# Altium PCB TYPEC_4KRECEIVER-v1.0.PcbDoc (part 8 of 12)
Units mil, origin at the board's own origin, x right, y up, seen from the top; angles counter-clockwise.
Board outline 2834.7 x 1259.84 mil, 10 copper layers (Top Layer, GND-1, Signal L1, GND-2, PWR-1, PWR-2, GND-3, Signal L2, GND-4, Bottom Layer), stack 61.686 mil thick; 492 components, 339 nets, 2214 pads, 1169 vias.
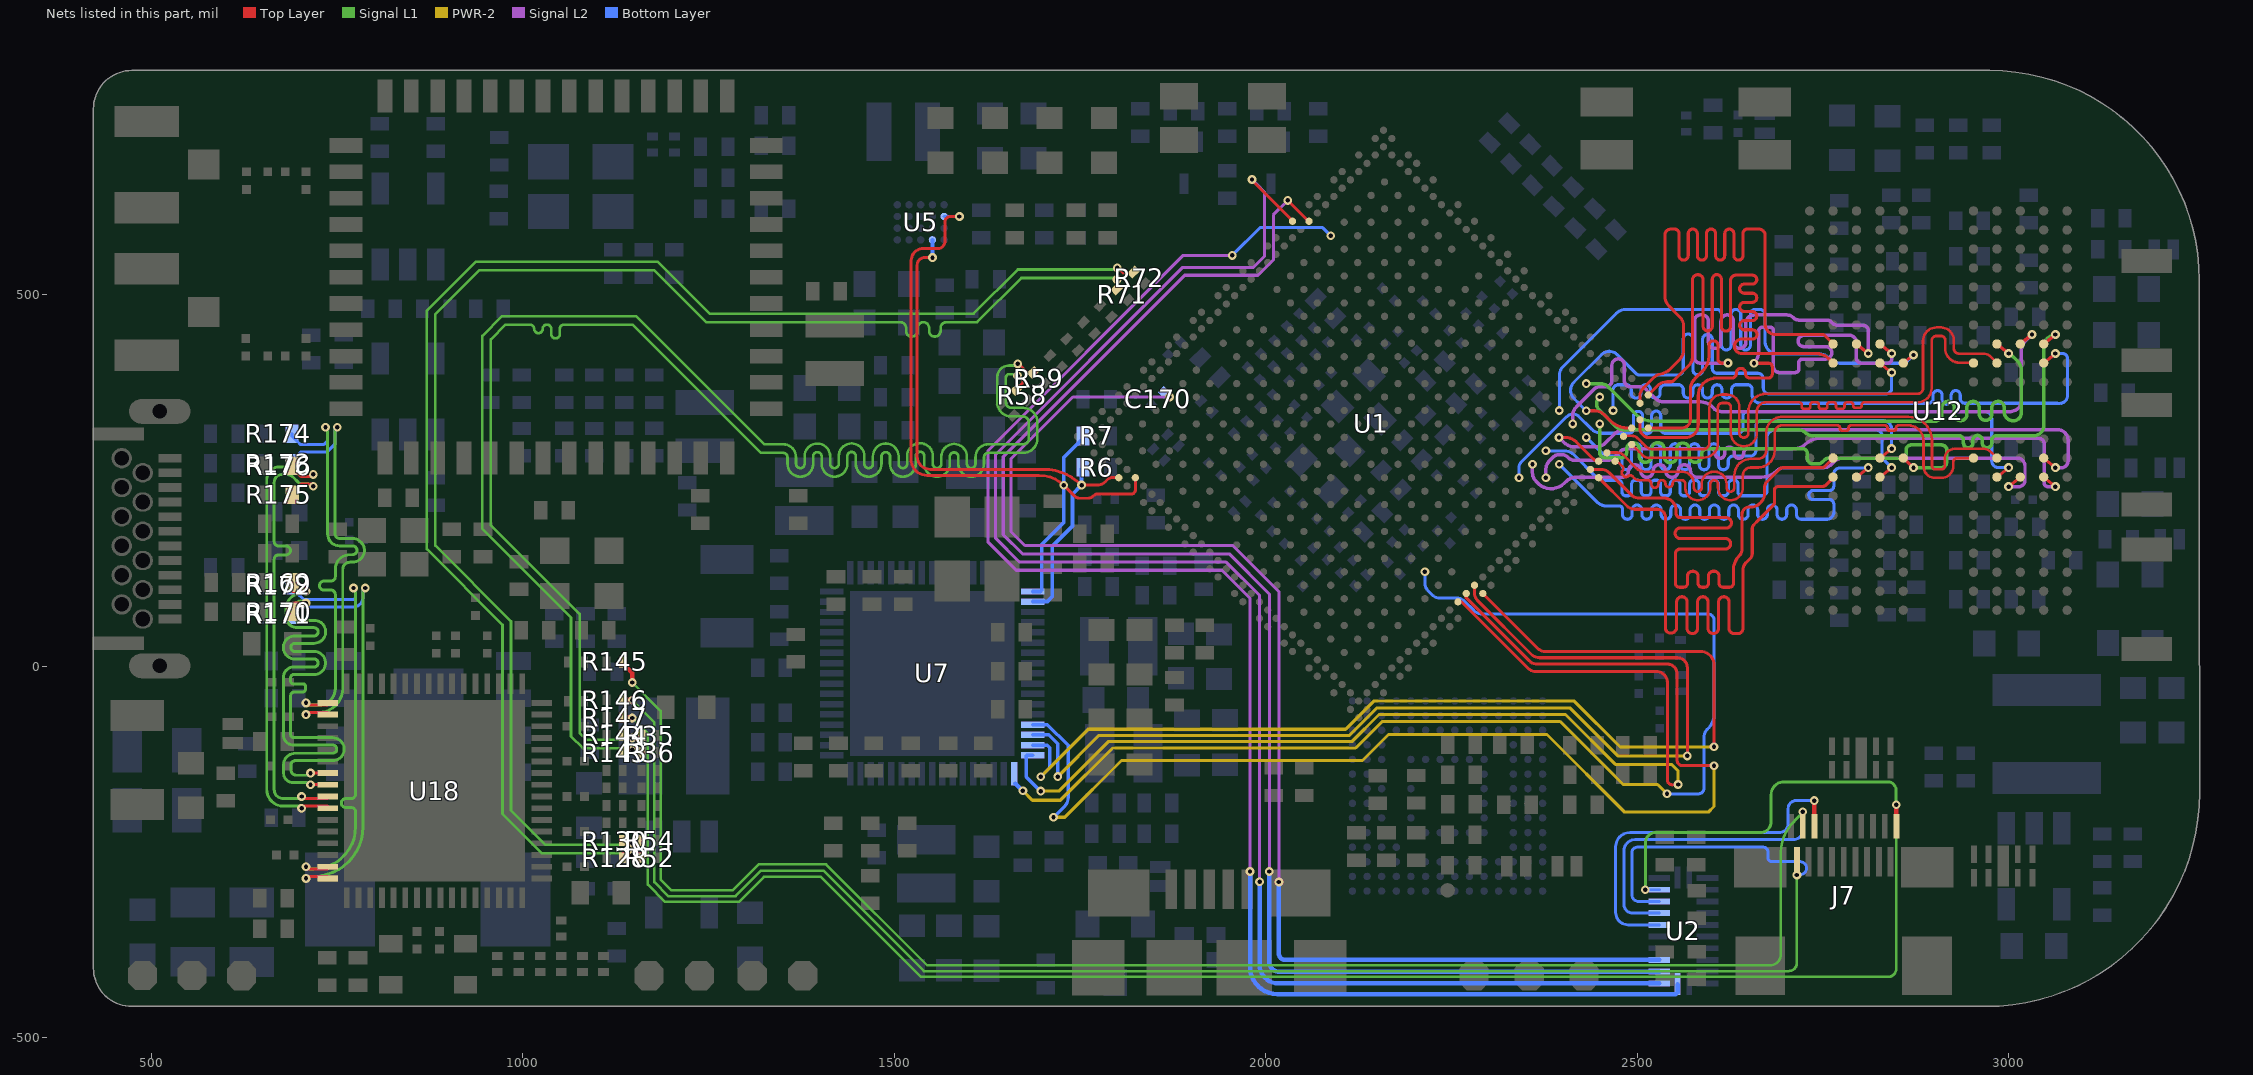
[diagram p13: the nets of this part, all layers, seen from the top]

## Via types
v1: diameter 11.81, hole 5.91, Top Layer to Bottom Layer, tented both sides, 698 vias
v2: diameter 15.75, hole 7.87, Top Layer to Bottom Layer, tented both sides, 248 vias
v3: diameter 11.81, hole 5.91, Top Layer to Signal L1, tented both sides, 121 vias
v4: diameter 11.81, hole 5.91, Top Layer to Bottom Layer, 44 vias
v5: diameter 11.81, hole 5.91, Signal L2 to Bottom Layer, 41 vias
v6: diameter 11.81, hole 5.91, Top Layer to Signal L1, 17 vias

## Nets (pads, with @x,y where several pads share a name; then routed paths per layer and width w, separated by ;. In a path a pad name is that pad's centre, name@x,y a point inside that pad or via, vN(x,y) a via of type N, cw(c..) or ccw(c..) an arc to the next point about the centre after c; other vN are vias at no path point) (continued)
HDMI_TX2_N: R36.1 R59.2 R143.1 | length 1998.7
  Top Layer w3.5: R143.1@1134.71,-116.59 1134.71,-110.73 1147.54,-110.65 v3(1147.55,-112.8) ; v3@1147.57,-110.65 1160.21,-110.73 R36.1@1160.25,-116.59 ; v6(1666.48,406.58) 1668.2,406.58 1680.88,393.91 1685.92,393.91 R59.2@1687.2,395.18
  Signal L1 w3.5: v3(1147.55,-112.8) ccw(c1145.4,-112.8) 1146.85,-111.21 ccw(c1145.4,-112.8) 1145.4,-110.65 1080.99,-110.65 1065.17,-94.83 1065.17,65.25 945.75,184.67 945.75,444.49 972.25,470.99 1152.78,470.99 1250.78,373 1325.38,298.4 1350.76,298.4 cw(c1350.76,281.15) 1368.01,281.15 1368.01,272.09 ccw(c1373.76,272.09) 1373.76,266.35 ccw(c1373.76,272.09) 1379.51,272.09 ; v3@1147.55,-111.21 1148.96,-111.21 v3@1150.55,-112.8 ; 1379.51,272.14 1379.51,282.15 cw(c1396.76,282.04) 1414.01,282.08 1414.01,272.1 ccw(c1419.76,272.09) 1419.76,266.35 ccw(c1419.76,272.09) 1425.51,272.09 1425.51,282.33 cw(c1442.76,282.31) 1460.01,282.37 1460.01,272.1 ; 1460.01,272.09 ccw(c1465.76,272.09) 1465.76,266.35 ccw(c1465.76,272.09) 1471.51,272.09 1471.51,282.21 cw(c1488.76,282.2) 1506.01,282.26 1506.01,272.1 ccw(c1511.76,272.09) 1511.76,266.35 ccw(c1511.76,272.09) 1517.51,272.09 1517.51,282.41 cw(c1535.01,282.41) 1535,299.9 ; 1535.03,299.9 cw(c1535.01,282.9) 1552.01,282.9 1552.01,272.09 ccw(c1557.76,272.09) 1557.76,266.35 ccw(c1557.76,272.09) 1563.51,272.09 1563.51,281.67 cw(c1580.76,281.66) 1598.01,281.72 1598.01,272.1 ccw(c1603.76,272.09) 1603.76,266.35 ccw(c1603.76,272.09) 1609.51,272.09 1609.51,281.15 cw(c1626.76,281.15) 1626.76,298.4 1673.52,298.4 ccw(c1673.52,306.3) 1681.42,306.3 1681.42,327.54 ccw(c1672.93,327.54) 1673.18,336.03 1657.39,336.04 cw(c1657.39,354.45) 1651.74,336.93 cw(c1657.39,354.45) 1639.87,348.79 cw(c1657.39,354.45) 1638.98,354.45 1638.98,388.8 cw(c1654.62,388.8) 1654.62,404.43 1664.33,404.43 ccw(c1664.33,406.58) v6(1666.48,406.58)
HDMI_TX2_P: R35.1 R58.2 R144.1 | length 1998.7
  Top Layer w3.5: R144.1@1134.71,-93.37 1134.71,-99.23 1147.52,-99.15 v3(1147.55,-96.99) ; v3@1147.59,-99.15 1160.21,-99.23 R35.1@1160.25,-93.37 ; R58.2@1664.7,372.41 1672.9,380.61 1672.9,384.06 v6(1666.18,390.78)
  Signal L1 w3.5: v3@1147.55,-98.58 1148.96,-98.58 v3@1150.55,-96.99 ; v3(1147.55,-96.99) cw(c1145.4,-96.99) 1146.85,-98.58 cw(c1145.4,-96.99) 1145.4,-99.15 1085.76,-99.15 1076.67,-90.06 1076.67,70.01 957.25,189.43 957.25,439.73 977.01,459.49 1009.78,459.49 cw(c1009.78,453.74) 1015.53,453.74 ccw(c1021.28,453.74) 1027.03,453.74 cw(c1032.78,453.74) 1038.53,453.74 1038.53,446.71 ccw(c1044.28,446.71) 1050.03,446.71 1050.03,453.74 cw(c1055.78,453.74) 1055.78,459.49 1148.02,459.49 1320.62,286.9 1350.76,286.9 cw(c1350.76,281.15) 1356.51,281.15 1356.51,272.09 ccw(c1373.76,272.09) 1373.76,254.85 ccw(c1373.76,272.09) 1391.01,272.09 ; 1391.01,272.13 1391.01,282.09 cw(c1396.76,282.04) 1402.51,282.08 1402.51,272.09 ccw(c1419.76,272.09) 1419.76,254.85 ccw(c1419.76,272.09) 1437.01,272.09 1437.01,282.32 cw(c1442.76,282.31) 1448.51,282.34 1448.51,272.09 ccw(c1465.76,272.09) 1465.76,254.85 ccw(c1465.76,272.09) 1483.01,272.09 1483.01,282.21 cw(c1488.76,282.2) 1494.51,282.22 1494.51,272.09 ccw(c1511.76,272.09) 1511.76,254.85 ccw(c1511.76,272.09) 1529.01,272.09 1529.01,282.41 cw(c1535.01,282.41) 1534.97,288.4 cw(c1535.01,282.9) 1540.51,282.9 1540.51,272.09 ccw(c1557.76,272.09) 1557.76,254.85 ccw(c1557.76,272.09) 1575.01,272.09 1575.01,281.67 cw(c1580.76,281.66) 1586.51,281.68 1586.51,272.09 ccw(c1603.76,272.09) 1603.76,254.85 ccw(c1603.76,272.09) 1621.01,272.09 1621.01,281.15 cw(c1626.76,281.15) 1626.76,286.9 1673.59,286.9 ccw(c1673.66,306.16) 1692.92,306.16 1692.92,327.85 ccw(c1673.24,327.85) 1673.53,347.53 1657.39,347.54 cw(c1657.39,354.45) 1650.48,354.45 1650.48,388.39 cw(c1655.03,388.39) 1655.03,392.93 1664.03,392.93 cw(c1664.03,390.78) v6(1666.18,390.78)
HDMI_TX_CEC: J7.15 U2.6 | length 503.6
  Top Layer w6: J7.15@2738.58,-215.28 v1(2738.58,-181.19) v1@2738.58,-179.97
  Bottom Layer w4: U2.6@2529.88,-348.4 2487.87,-348.4 cw(c2487.87,-331.76) 2471.23,-331.76 2471.23,-243.21 cw(c2490.25,-243.21) 2490.25,-224.19 2691.44,-224.19 ccw(c2691.44,-212.28) 2703.35,-212.28 2703.35,-191.7 cw(c2713.86,-191.7) 2713.86,-181.19 v1(2738.58,-181.19)
HDMI_TX_HPD: J7.1 R147.1 U2.9 | length 2767.7
  Top Layer w4: v1(2848.79,-186.84) v1@2848.9,-186.95 ; J7.1@2848.9,-215.37 J7.1@2849.02,-215.48
  Top Layer w6: J7.1@2848.9,-215.37 v1@2848.9,-186.95
  Top Layer w8: R147.1@1136.21,-69.96 v3(1147.55,-69.96)
  Signal L1 w3.5: v3(1147.55,-69.96) 1168.49,-90.9 1168.49,-294.36 1191.48,-317.36 1291.15,-317.36 1324.82,-283.69 1401.39,-283.69 1536.13,-418.43 2838.01,-418.43 ccw(c2838.01,-407.65) 2848.79,-407.65 v1(2848.79,-186.84)
  Signal L1 w4: v1(2511.11,-301.15) 2511.11,-238.17 cw(c2525.1,-238.17) 2525.1,-224.19 2666.01,-224.19 ccw(c2666.01,-209.83) 2680.38,-209.83 2680.38,-173.49 cw(c2698.05,-173.49) 2698.05,-155.81 2837.04,-155.81 cw(c2837.04,-167.56) 2848.79,-167.56 v1(2848.79,-186.84)
  Bottom Layer w4: v1(2511.11,-301.15) U2.9@2529.88,-301.15
HDMI_TX_SCL: J7.17 R145.1 U2.7 | length 2529.9
  Top Layer w4: J7.17@2723.04,-215.48 v1@2723.04,-198.95
  Top Layer w5.6: R145.1@1134.71,5.47 1134.71,3.5 1147.55,-9.34 v3(1147.55,-22.15)
  Signal L1 w3.5: v3(1147.55,-22.15) 1185.77,-60.36 1185.77,-287.08 1200.68,-302 1282.64,-302 1317.66,-266.98 1408.57,-266.98 1544.61,-403.02 2678.64,-403.02 ccw(c2678.64,-388.01) 2693.65,-388.01 2693.65,-250.65 cw(c2750.22,-250.62) 2708.18,-212.77 v1(2723.04,-196.27)
  Bottom Layer w4: U2.7@2529.88,-332.65 2494.06,-332.65 cw(c2494.06,-321.02) 2482.42,-321.02 2482.42,-249.37 2482.41,-249.02 cw(c2497.35,-248.62) 2497.35,-233.68 2710.69,-233.68 ccw(c2710.69,-221.33) 2723.04,-221.33 v1@2723.04,-198.95
HDMI_TX_SDA: J7.18 R146.1 U2.8 | length 2402.2
  Top Layer w4: v1(2715.08,-281.28) 2715.16,-281.2 J7.18@2715.16,-263.51
  Top Layer w8: R146.1@1136.21,-46.06 v3(1147.55,-46.06)
  Signal L1 w3.5: v3(1147.55,-46.06) 1177.23,-75.73 1177.23,-290.92 1195.95,-309.64 1286.63,-309.64 1320.9,-275.36 1404.87,-275.36 1540.09,-410.58 2704.02,-410.58 ccw(c2704.02,-399.52) 2715.08,-399.52 v1(2715.08,-281.28)
  Bottom Layer w4: U2.8@2529.88,-316.9 2502.03,-316.9 cw(c2502.03,-307.93) 2493.06,-307.93 2493.06,-250.93 cw(c2500.12,-250.93) 2500.12,-243.87 2670.09,-243.87 cw(c2670.09,-249.78) 2676,-249.78 2676,-257.6 ccw(c2681.79,-257.6) 2681.79,-263.39 2719.91,-263.39 cw(c2719.91,-267.39) 2720.25,-263.4 cw(c2719.4,-272.08) 2721.35,-280.57 v1(2715.08,-281.28)
HDMI_TXCLK_N: R52.1 R72.2 R128.1 | length 1998.7
  Top Layer w3.5: R128.1@1134.71,-258.2 1134.71,-252.34 1147.54,-252.25 v3(1147.55,-254.41) ; v3@1147.57,-252.25 1160.21,-252.34 R52.1@1160.25,-258.2 ; v6@1800.8,536.17 1808.18,528.8 R72.2@1815.76,528.8 ; R72.2@1815.76,528.79 1820.81,528.79 R72.2@1822.2,530.18
  Signal L1 w3.5: v3(1147.55,-254.41) ccw(c1145.4,-254.41) 1145.4,-252.25 1025.98,-252.25 972.87,-199.14 972.87,55.43 871.11,157.19 871.11,478.41 936.92,544.22 1181.76,544.22 1251.72,474.27 1607.09,474.27 1666.53,533.71 1798.33,533.71 ccw(c1798.33,535.86) v6(1800.48,535.86) ; v3@1147.55,-252.25 1150.55,-252.25 v3@1150.55,-254.41
HDMI_TXCLK_P: R54.1 R71.2 R130.1 | length 1998.7
  Top Layer w3.5: R130.1@1134.71,-234.98 1134.71,-240.84 1147.52,-240.75 v3(1147.55,-238.6) ; v3@1147.59,-240.75 1160.21,-240.84 R54.1@1160.25,-234.98 ; R71.2@1799.7,507.68 1801.09,509.07 1801.09,514.12 1800.96,514.24 v6@1800.96,519.75
  Signal L1 w3.5: v3@1147.55,-240.75 1150.55,-240.75 v3@1150.55,-238.6 ; v3(1147.55,-238.6) cw(c1145.4,-238.6) 1145.4,-240.75 1030.75,-240.75 984.37,-194.37 984.37,60.2 882.61,161.95 882.61,473.65 941.69,532.72 1177,532.72 1246.96,462.77 1491.09,462.77 1508.34,462.77 cw(c1508.34,455.02) 1516.09,455.02 1516.09,451.16 ccw(c1523.84,451.16) 1531.59,451.16 1531.59,455.02 cw(c1539.34,455.02) 1547.09,455.02 1547.09,451.19 ccw(c1554.84,451.19) 1562.59,451.19 1562.59,455.02 cw(c1570.34,455.02) 1570.34,462.77 1599.18,462.77 1611.85,462.77 1671.29,522.21 1798.03,522.21 cw(c1798.03,520.05) v6(1800.18,520.05)
HDMITX_CEC: U1.1V5 U2.24 | length 2201.8
  Signal L2 w4.1: v5(1955.2,552.67) 1889.01,552.67 1626.52,290.18 1626.52,166.58 1664.22,128.88 1941.45,128.88 1979.08,91.25 v5(1979.08,-276.57)
  Bottom Layer w4.1: v5(1955.2,552.67) 1992.55,590.03 2076.89,590.03 v1(2087.75,579.16)
  Bottom Layer w6: v5(1979.08,-276.57) 1979.08,-405.02 ccw(c2015.68,-405.02) 2015.68,-441.62 2551.81,-441.62 2554.48,-438.95 U2.24@2554.48,-428.12
HDMITX_HPD: C170.2 U1.1V17 U2.3 | length 1743.9
  Signal L2 w4.1: v1(1870.52,362.02) 1740.49,362.02 1657.2,278.73 1657.2,181.01 1675.91,162.29 1955.82,162.29 2017.92,100.19 v5(2017.92,-290.66)
  Bottom Layer w6: v5(2017.92,-290.66) 2017.92,-387.07 ccw(c2026.5,-387.07) 2026.5,-395.66 U2.3@2529.88,-395.64
HDMITX_SCL: U1.AR12 U2.1 | length 2210.9
  Top Layer w4.1: v1(1981.78,654.81) 1981.78,653.96 2036.26,599.49 U1.AR12@2036.26,598.64
  Signal L2 w4.1: v1(1981.78,654.81) 1989.33,647.27 1998.61,637.98 1998.61,551.43 1983.71,536.53 1888.39,536.53 1636.65,284.78 1636.65,171.89 1668.73,139.81 1947.02,139.81 1991.99,94.84 v5(1991.99,-290.44)
  Bottom Layer w6: v5(1991.99,-290.44) 1991.99,-402.12 ccw(c2017.1,-402.12) 2017.1,-427.23 2529.78,-427.23 U2.1@2529.88,-427.14
HDMITX_SDA: U1.AP11 U2.2 | length 2123.3
  Top Layer w4.1: v1(2029.81,626.65) 2057.81,598.64 U1.AP11@2058.53,598.64
  Signal L2 w4.1: v5@2005.01,-274.32 2005.01,97.02 1951.08,150.95 1672.78,150.95 1646.88,176.86 1646.88,281.75 1891.04,525.91 1989.92,525.91 2010.5,546.48 2010.5,607.33 v1(2029.81,626.65)
  Bottom Layer w6: v5(2005.01,-276.57) 2005.01,-398.33 ccw(c2018.13,-398.33) 2018.13,-411.45 2529.81,-411.45 U2.2@2529.88,-411.39
I2C0_SCL_PMIC: R7.2 U1.AJ37 U5.A3 U7.1 | length 985.4
  Top Layer w4: 1523.05,275.03 ccw(c1527.05,275.08) 1523.09,274.48 ccw(c1544.08,277.95) 1544.08,256.68 ; 1523.05,275.08 1523.05,545.73 cw(c1539.23,545.73) 1539.23,561.91 1559.4,561.91 ; 1544.12,256.68 1628.56,256.68 1682.49,256.68 1695.2,256.68 cw(c1695.2,208.78) 1729.08,242.65 1743.19,228.53 ccw(c1749.73,235.01) 1749.73,225.8 ; 1559.42,561.91 ccw(c1559.4,565.91) 1559.86,561.93 ccw(c1558.7,571.52) 1568.35,571.86 1568.33,572.27 1568.33,597.56 cw(c1575.84,597.56) 1575.84,605.06 v1(1587.86,605.06) ; 1749.76,225.8 1760.51,225.8 ccw(c1760.51,237.11) 1765.25,226.85 ccw(c1760.51,237.11) 1768.5,229.12 cw(c1774.64,222.98) 1774.64,231.66 1785.38,231.66 1799.42,231.66 1819.75,231.66 ccw(c1819.74,236.6) 1824.68,236.6 U1.AJ37@1824.68,253.44
  Bottom Layer w4.1: U5.A3@1567.36,605.06 v1(1587.86,605.06)
  Bottom Layer w5: U7.1@1686.51,100.27 1696.86,100.27 1698.69,102.1 1698.69,163.45 1728.24,193 1728.24,280.52 1736.85,289.13 1747.3,299.58 1747.68,299.58 1754.18,306.08 R7.2@1754.18,307.58
  other v1: 1728.41,243.4
I2C0_SDA_PMIC: R6.2 U1.AK38 U5.B1 U7.2 | length 818.2
  Top Layer w4: v1(1551.61,549.73) 1540.93,549.73 ccw(c1540.93,539.85) 1531.05,539.85 1531.05,281.91 ccw(c1548.2,281.91) 1548.2,264.76 1701,264.76 1701.05,264.76 cw(c1701.03,192.23) v1(1752.31,243.49)
  Top Layer w4.1: v1(1752.31,243.49) 1773,243.49 ccw(c1773,259.69) 1784.46,248.23 1787.96,251.73 cw(c1792.1,247.59) 1792.1,253.44 U1.AK38@1802.41,253.44
  Bottom Layer w4: R6.2@1752.54,265.61 R6.2@1754.18,267.26
  Bottom Layer w5: v1(1551.61,549.73) U5.B1@1551.61,573.56 ; U7.2@1686.51,86.49 1686.97,86.95 1706.54,86.95 1712.7,93.1 1712.7,160.99 1740.09,188.38 1740.09,231.26 v1(1752.31,243.49) 1752.36,265.43 R6.2@1752.54,265.61
I2S1_LRCK_TX_M0: U1.B24 U7.14 | length 1703.5
  Top Layer w4.1: U1.B24@2270.1,97.55 2270.1,91.75 2354.94,6.91 ccw(c2365.54,17.53) 2365.54,2.53 2540.77,2.53 cw(c2540.77,-10.5) 2553.8,-10.5 2553.8,-126.55 ccw(c2561.41,-126.55) 2561.41,-134.17 v1(2603.61,-134.17)
  PWR-2 w4.1: v1(1714.56,-203.54) 1729.68,-203.54 1806,-127.22 2130.49,-127.22 2165.51,-92.21 2378.72,-92.21 2483.28,-196.77 2595.9,-196.77 2603.61,-189.05 v1(2603.61,-134.17)
  Bottom Layer w4.5: U7.14@1686.51,-78.87 1686.62,-78.98 1706.37,-78.98 1734.26,-106.88 1734.26,-177.12 cw(c1718.02,-177.12) 1729.48,-188.63 v1(1714.56,-203.54)
I2S1_MCLK_M0: U1.A23 U7.16 | length 1505.6
  Top Layer w4.1: U1.A23@2292.37,97.55 2365.77,24.12 ccw(c2376.88,35.15) 2376.84,19.49 2585.41,19.49 cw(c2585.41,1.29) 2603.61,1.29 v1(2603.61,-108.75)
  PWR-2 w4.1: v1(1697.36,-148.97) 1761.22,-85.11 2107.82,-85.11 2145.54,-47.38 2415.54,-47.38 2476.91,-108.75 v1(2603.61,-108.75)
  Bottom Layer w4.5: U7.16@1686.67,-106.59 1706.41,-106.59 1709.56,-109.74 1709.56,-136.77 v1(1697.36,-148.97)
I2S1_SCLK_TX_M0: U1.B23 U7.15 | length 1456.9
  Top Layer w4.1: U1.B23@2281.24,108.68 2281.24,98.44 ccw(c2296.24,98.44) 2285.63,87.84 2357.93,15.53 ccw(c2368.54,26.14) 2368.54,11.14 2554.36,11.14 cw(c2554.36,-2.11) 2567.61,-2.11 v1(2567.61,-120.97)
  PWR-2 w4.1: v1(1720.15,-148.87) 1775.36,-93.67 2112.78,-93.67 2150.09,-56.36 2409.49,-56.36 2474.11,-120.97 v1(2567.61,-120.97)
  Bottom Layer w4.5: U7.15@1686.51,-92.65 1708.01,-92.65 1720.15,-104.79 v1(1720.15,-148.87)
I2S1_SDI0_M0: U1.1B14 U7.18 | length 1680.8
  PWR-2 w4.1: v1(1673.36,-167.97) 1686.06,-180.68 1723.65,-180.68 1794.09,-110.23 2121.19,-110.23 2156.84,-74.58 2396.43,-74.58 2481.24,-159.39 2527.67,-159.39 v1(2540.26,-171.97)
  Bottom Layer w4.1: v1@2214.42,126.78 2214.42,111.67 ccw(c2229.42,111.67) 2218.81,101.07 2223.96,95.92 ccw(c2234.57,106.53) 2234.57,91.53 2257.14,91.53 cw(c2257.14,76.53) 2267.74,87.14 2279.98,74.9 ccw(c2291.88,86.79) 2291.88,69.97 2595.55,69.97 cw(c2595.55,61.9) 2603.61,61.9 2603.61,-65.65 cw(c2578.43,-65.65) 2596.22,-83.47 2594.7,-84.99 ; v1(2540.26,-171.97) 2583.06,-171.97 ccw(c2583.06,-165.16) 2589.87,-165.16 2589.87,-96.67 cw(c2606.38,-96.67) 2594.69,-85.01
  Bottom Layer w6: U7.18@1663.34,-158.61 v1@1672.36,-167.62
  other v1: 2214.42,126.78
I2S1_SDO0_M0: U1.B25 U7.17 | length 1492.8
  Top Layer w4.1: U1.B25@2258.97,86.41 2263.8,86.41 2353.29,-3.09 ccw(c2363.89,7.53) 2363.89,-7.47 2525.98,-7.47 cw(c2525.98,-22.29) 2540.8,-22.29 2540.8,-153.28 ccw(c2547.39,-153.32) 2547.25,-159.91 ccw(c2547.3,-155.81) 2547.31,-159.91 2547.42,-159.91 2547.53,-159.91 v1(2555.26,-159.47)
  PWR-2 w4.1: v1(1697.36,-168.42) 1721.66,-168.42 1788.18,-101.9 2116,-101.9 2152.55,-65.35 2403.76,-65.35 2470.68,-132.27 2546.24,-132.27 2555.26,-141.29 v1(2555.26,-159.47)
  Bottom Layer w5: U7.17@1686.51,-120.21 1678.63,-120.21 1677.8,-121.04 1677.8,-149.24 1696.98,-168.42 v1(1697.36,-168.42)
LANE0_RX2_N: R175.1 U18.41 | length 636.8
  Top Layer w4.1: R175.1@690.09,230.3 690.09,233.8 697.04,240.75 697.42,240.75 701.57,244.9 718.1,244.9 v3(718.1,242.04) ; v3(702.46,-175.61) 702.46,-178.46 737.43,-178.47 U18.41@737.43,-175.65
  Signal L1 w4: 677.95,-178.52 cw(c677.93,-166.19) 665.61,-166.19 665.61,-164.61 665.61,124.45 665.61,143.55 cw(c671.61,143.55) 670.39,149.42 671.61,149.55 681.44,149.55 ccw(c681.44,155.55) 681.44,161.55 671.61,161.55 cw(c671.61,167.55) 670.39,161.68 cw(c671.61,167.55) 665.61,167.55 665.61,247.3 cw(c676.06,247.3) 667.38,253.11 cw(c676.06,247.3) 670.25,255.98 cw(c676.06,247.3) 676.06,257.74 681.77,257.74 cw(c681.77,243.96) 691.51,253.71 697.36,247.86 ccw(c704.39,254.89) 697.4,247.82 ccw(c704.39,254.89) 704.35,244.95 ; 677.96,-178.52 679.51,-178.51 702.46,-178.51 v3(702.46,-175.61) ; 704.39,244.95 711.08,244.95 cw(c711.08,235.03) v3(718.1,242.04)
LANE0_RX2_P: R176.1 U18.42 | length 636.7
  Top Layer w4.1: R176.1@690.09,269.6 690.09,266.1 697.04,259.15 697.28,259.15 701.43,255 718.1,255 v3(718.1,257.85) ; v3(702.46,-191.42) 702.46,-188.56 737.43,-188.57 U18.42@737.43,-191.39
  Signal L1 w4: 701.35,258.01 694.53,264.83 ccw(c687.5,257.8) 687.5,267.74 672.01,267.74 ccw(c672.01,251.34) 667.13,267 ccw(c672.01,251.34) 656.36,256.23 ccw(c672.01,251.34) 655.61,251.34 655.61,124.45 655.61,-164.61 655.61,-166.19 ccw(c677.93,-166.19) 677.96,-188.52 679.52,-188.51 702.46,-188.51 v3(702.46,-191.42) ; 701.36,258 ccw(c708.75,265.4) 708.75,254.95 711.02,254.95 ccw(c711.02,259.91) 714.53,256.4 cw(c718.04,252.89) 718.04,257.85 v3(718.1,257.85)
LANE1_TX2_N: R173.1 U18.34 | length 600.2
  Top Layer w4.1: v3(708.46,-65.44) 708.46,-62.59 737.43,-62.59 U18.34@737.43,-65.42
  Signal L1 w4: v3(708.46,-65.44) cw(c711.37,-65.44) 711.37,-62.53 725.53,-62.53 ccw(c725.53,-30.17) 757.9,-30.17 757.9,130.11 cw(c767.51,130.11) 767.51,139.73 771.01,139.73 ccw(c771.01,155.73) 771.01,171.73 753.65,171.73 cw(c753.65,177.73) 747.65,177.73 747.65,318.47 cw(c750.55,318.47) v4(750.55,321.38)
  Bottom Layer w4.1: R173.1@689.68,273.06 689.68,276.56 696.63,283.51 696.89,283.51 701.16,287.78 736.36,287.78 747.7,299.12 747.7,318.52 cw(c750.55,318.52) v4(750.55,321.38)
LANE1_TX2_P: R174.1 U18.33 | length 600.3
  Top Layer w4.1: v3(708.46,-49.63) 708.46,-52.49 737.43,-52.49 U18.33@737.43,-49.67
  Signal L1 w4: v3(708.46,-49.63) ccw(c711.37,-49.63) 711.37,-52.54 725.53,-52.53 ccw(c725.53,-30.17) 747.9,-30.17 747.9,94.28 747.9,96.28 ccw(c741.9,96.28) 743.32,102.11 ccw(c741.9,96.28) 743.27,102.13 ccw(c741.9,96.28) 741.9,102.28 732.54,102.28 cw(c732.54,108.28) 732.54,114.28 741.9,114.28 ccw(c741.9,120.28) 743.27,114.44 ccw(c741.9,120.28) 743.32,114.45 ccw(c741.9,120.28) 747.9,120.28 747.9,130.45 cw(c767.18,130.45) 767.18,149.73 771.01,149.73 ccw(c771.01,155.73) 771.01,161.73 753.65,161.73 cw(c753.65,177.73) 737.65,177.73 737.65,318.47 ccw(c734.74,318.47) v4(734.74,321.38)
  Bottom Layer w4.1: R174.1@689.68,312.6 689.68,309.1 696.63,302.15 696.99,302.15 701.26,297.88 732.18,297.88 737.6,303.3 737.6,318.52 ccw(c734.74,318.52) v4(734.74,321.38)
LANE2_TX1_N: R169.1 U18.40 | length 637
  Top Layer w4.1: R169.1@690.36,112.39 690.36,100.64 v3(708.36,100.64) ; v3(714.46,-159.93) 714.72,-159.67 737.2,-159.67 U18.40@737.43,-159.91
  Signal L1 w4: v3(708.36,100.64) 708.36,97.73 702.73,97.73 ccw(c702.73,76.35) 681.34,76.35 681.34,67.03 ccw(c696.84,67.03) 696.84,51.53 719.43,51.53 cw(c719.43,46.03) 719.43,40.53 693.47,40.53 ccw(c693.47,25.03) 693.47,9.53 719.26,9.53 cw(c719.26,4.03) 719.26,-1.47 691.84,-1.47 ccw(c691.84,-15.47) 677.84,-15.47 677.84,-92.43 ccw(c691.84,-92.43) 691.84,-106.43 744.33,-106.43 cw(c744.33,-111.93) 744.33,-117.43 693.78,-117.43 ccw(c693.78,-132.93) 678.28,-132.93 678.28,-144.28 ccw(c691.03,-144.28) 691.03,-157.02 714.46,-157.03 v3(714.46,-159.93)
LANE2_TX1_P: R170.1 U18.39 | length 636.8
  Top Layer w4.1: R170.1@690.35,73.08 690.35,84.83 v3(708.36,84.83) ; v3@714.48,-144.14 U18.39@737.43,-144.16
  Signal L1 w4: v3(708.36,84.83) 708.36,87.73 702.73,87.73 ccw(c702.73,76.35) 691.34,76.35 691.34,67.03 ccw(c696.84,67.03) 696.84,61.53 719.43,61.53 cw(c719.43,46.03) 719.43,30.53 693.47,30.53 ccw(c693.47,25.03) 693.47,19.53 719.26,19.53 cw(c719.26,4.03) 719.26,-11.47 691.84,-11.47 ccw(c691.84,-15.47) 689,-12.67 ccw(c691.84,-15.47) 687.84,-15.47 687.84,-20.55 ccw(c691.29,-20.55) 691.29,-23.99 704.13,-23.99 cw(c704.13,-27.67) 707.81,-27.67 707.81,-31.16 cw(c704.13,-31.16) 704.13,-34.84 692.81,-34.84 ccw(c692.81,-39.8) 687.84,-39.79 687.84,-45.53 687.84,-92.43 ccw(c691.84,-92.43) 691.84,-96.43 744.33,-96.43 cw(c744.33,-111.93) 744.33,-127.43 693.78,-127.43 ccw(c693.78,-131.43) 692.23,-127.74 690.65,-128.41 ccw(c693.78,-132.93) 688.28,-132.93 688.28,-140.14 ccw(c695.17,-140.14) 695.17,-147.02 714.46,-147.03 v3(714.46,-144.12)
LANE3_RX1_N: R172.1 U18.47 | length 600.2
  Top Layer w4.1: v3(708.46,-270.1) 708.46,-272.95 737.43,-272.96 U18.47@737.43,-270.14
  Signal L1 w4: v3(708.46,-270.1) ccw(c711.37,-270.1) 711.37,-273.01 718.63,-273 ccw(c718.63,-216.37) 775.26,-216.37 775.26,-198.45 775.26,-196.45 ccw(c769.26,-196.45) 771.29,-190.8 ccw(c769.26,-196.45) 769.26,-190.45 762.03,-190.45 cw(c762.03,-184.45) 762.03,-178.45 769.26,-178.45 ccw(c769.26,-172.45) 771.29,-178.1 ccw(c769.26,-172.45) 775.26,-172.45 775.26,-162.78 775.26,104.94 v4(772.36,104.94)
  Bottom Layer w4.1: R172.1@689.36,108.45 689.36,104.95 696.31,98 696.79,98 705.11,89.69 771.91,89.69 ccw(c771.91,92.99) 775.21,92.99 775.21,104.94 v4(772.36,104.94)
LANE3_RX1_P: R171.1 U18.48 | length 600.2
  Top Layer w4.1: v3(708.46,-285.91) 708.46,-283.06 737.43,-283.06 U18.48@737.43,-285.89
  Signal L1 w4: v3(708.46,-285.91) cw(c711.37,-285.91) 711.37,-283 718.63,-283 ccw(c718.63,-216.37) 785.26,-216.37 785.26,104.94 v4(788.17,104.94)
  Bottom Layer w4.1: R171.1@689.36,69.15 689.36,72.64 696.31,79.59 772.13,79.59 ccw(c772.13,92.77) 785.31,92.77 785.31,104.94 v4(788.17,104.94)
LPDDR4_A0_A: U1.C2 U12.H2 | length 924.2
  Top Layer w4.2: U1.C2@2503.95,353.66 2503.95,363.68 cw(c2518,363.68) 2508.06,373.61 ; 2508.06,373.62 2524.02,389.57 cw(c2532.41,381.17) 2528.87,392.5 ccw(c2526.87,417.49) 2544.59,399.77 2557.1,412.28 ccw(c2543.64,425.77) 2562.7,425.77 2562.7,457.61 ccw(c2545.79,457.61) 2557.75,469.57 2543.32,484 cw(c2557.72,498.4) 2537.36,498.4 2537.36,579.96 cw(c2545.5,579.96) 2545.5,588.1 2550.12,588.1 cw(c2550.12,581.7) 2556.51,581.7 2556.51,552.39 ccw(c2562.66,552.39) 2568.81,552.39 2568.81,581.95 cw(c2574.96,581.95) 2581.11,581.95 2581.11,552.39 ccw(c2587.26,552.39) 2593.41,552.39 2593.41,581.95 cw(c2599.56,581.95) 2605.71,581.95 2605.71,552.39 ccw(c2611.86,552.39) 2618.01,552.39 2618.01,581.95 cw(c2624.16,581.95) 2630.31,581.95 2630.31,552.39 ccw(c2636.46,552.39) 2642.61,552.39 2642.61,582.19 cw(c2648.52,582.19) 2648.52,588.1 2663.74,588.1 cw(c2663.74,579.48) 2672.36,579.48 2672.36,460.11 ccw(c2686.37,460.11) 2686.37,446.1 2751.14,446.1 U12.H2@2763.85,433.4
LPDDR4_A0_B: U1.A9 U12.R2 | length 924.9
  Top Layer w4.2: U1.A9@2448.27,253.44 2486.35,215.36 ccw(c2496.96,225.97) 2496.96,210.97 2527.37,210.97 cw(c2527.37,200.16) 2538.18,200.16 2538.18,51.19 ccw(c2545.18,51.19) 2545.18,44.19 ccw(c2545.18,52.25) 2553.25,52.25 2553.25,86.24 cw(c2560.3,86.24) 2567.35,86.24 2567.35,50.67 ccw(c2574.4,50.67) 2581.45,50.67 2581.45,86.24 cw(c2588.5,86.24) 2595.55,86.24 2595.55,50.67 ccw(c2602.6,50.67) 2609.65,50.67 2609.65,86.24 cw(c2616.7,86.24) 2623.75,86.24 2623.75,50.65 ccw(c2630.77,50.65) 2630.77,43.62 2635.84,43.62 ccw(c2635.84,50.2) 2642.42,50.2 2642.42,128.93 ; 2642.42,128.96 cw(c2656.8,128.99) 2646.61,139.14 2652.8,145.33 ccw(c2647.5,150.61) 2654.98,150.61 2654.98,184.65 cw(c2663.26,184.62) 2657.41,190.47 2662.37,195.44 2683.43,216.5 ccw(c2679.98,219.93) 2684.85,219.93 2684.85,236.61 cw(c2689.75,236.61) 2689.75,241.51 2748.84,241.51 ccw(c2748.85,249.58) 2754.57,243.89 U12.R2@2764.88,254.2
LPDDR4_A1_A: U1.C1 U12.J2 | length 923.8
  Top Layer w4.2: U1.C1@2515.08,364.8 2527.58,377.29 cw(c2540.21,364.66) 2540.21,382.53 2545.13,382.53 ccw(c2545.13,388.2) 2549.14,384.19 2570.78,405.83 ccw(c2562.05,414.56) 2574.39,414.56 2574.39,519.19 cw(c2581.93,519.19) 2581.93,526.72 cw(c2581.93,519.75) 2588.91,519.75 2588.91,457.22 ccw(c2595.06,457.22) 2601.21,457.22 2601.21,520.57 cw(c2607.36,520.57) 2613.51,520.57 2613.51,456.87 ccw(c2619.66,456.87) 2625.81,456.87 2625.81,518.83 cw(c2633.05,518.83) 2633.05,526.07 2655.25,526.07 cw(c2655.25,520.19) 2661.13,520.19 cw(c2654.98,520.19) 2654.98,514.04 2644.19,514.04 ccw(c2644.19,507.89) 2644.19,501.74 2654.98,501.74 cw(c2654.98,495.59) 2654.98,489.44 2644.19,489.44 ccw(c2644.19,483.29) 2644.19,477.14 2654.98,477.14 cw(c2654.98,470.99) 2654.98,464.84 2644.19,464.84 ccw(c2644.19,458.69) 2644.19,452.54 2654.98,452.54 ; 2655.3,452.5 cw(c2655.3,446.35) 2655.3,440.2 2640.99,440.2 ccw(c2640.99,430.36) 2640.99,420.51 2741.53,420.51 ; 2741.58,420.51 cw(c2741.56,397.37) 2757.89,413.76 U12.J2@2763.85,407.81
LPDDR4_A1_B: U1.B9 U12.P2 | length 924.2
  Top Layer w4.2: U1.B9@2437.14,264.58 2451.77,264.58 cw(c2451.77,249.58) 2462.38,260.19 2492.25,230.31 ccw(c2502.86,240.92) 2502.86,225.92 2536.73,225.92 cw(c2536.73,210.92) 2547.33,221.53 2548.02,220.84 cw(c2537.42,210.23) 2552.42,210.23 2552.42,205.58 ccw(c2558.18,205.58) 2558.18,199.82 2619.9,199.82 cw(c2619.9,192.77) 2619.9,185.72 2558.18,185.72 ccw(c2558.18,178.67) 2558.18,171.62 2618.92,171.62 cw(c2618.92,164.57) 2618.92,157.52 2558.18,157.52 ccw(c2558.18,150.83) 2551.5,150.83 2551.5,111.46 ccw(c2556.88,111.46) 2556.88,106.08 2562.72,106.08 ccw(c2562.72,111.33) 2567.97,111.33 2567.97,121 cw(c2574.42,121) 2574.42,127.46 2575.63,127.46 cw(c2575.63,121.02) 2582.07,121.02 2582.07,111.33 ccw(c2587.31,111.33) 2587.31,106.08 2590.92,106.08 ccw(c2590.92,111.33) 2596.17,111.33 2596.17,121 cw(c2602.77,121) 2602.77,127.61 2603.68,127.61 cw(c2603.68,121.02) 2610.27,121.02 2610.27,111.33 ccw(c2615.51,111.33) 2615.51,106.08 2624.63,106.08 ccw(c2624.63,111.16) 2629.71,111.16 2629.71,121.28 2629.71,130.04 cw(c2654.34,130.03) 2636.95,147.47 2637,147.52 ccw(c2626.39,158.12) 2641.39,158.12 2641.39,204.7 cw(c2650.61,204.7) 2650.61,213.92 2652.74,213.92 ccw(c2652.74,232.69) 2671.51,232.69 2671.51,240.09 cw(c2682.95,240.09) 2674.84,248.16 2691.15,264.47 cw(c2697.47,258.15) 2697.47,267.09 2748.37,267.09 ccw(c2748.37,273.67) 2753.02,269.02 U12.P2@2763.85,279.85
LPDDR4_A2_A: U1.1C1 U12.H9 | length 828.6
  Top Layer w4.2: U12.H9@2984.32,433.4 v1(3000.07,420.6)
  Signal L1 w4.7: v1(2431.56,380.11) 2450.57,380.11 ; 2450.62,380.11 cw(c2450.66,365.57) 2460.94,375.86 2465.71,371.08 2497.99,338.81 ; 2498.01,338.79 ccw(c2520.27,361.09) 2520.27,329.58 2900.97,329.58 ccw(c2900.97,338.88) 2910.27,338.88 2910.27,347.68 cw(c2918.67,347.68) 2927.07,347.68 2927.07,338.66 ccw(c2935.47,338.66) 2943.87,338.66 2943.87,347.68 cw(c2952.27,347.68) 2960.67,347.68 2960.67,338.91 ccw(c2969.07,338.91) 2977.47,338.91 2977.47,347.68 cw(c2985.87,347.68) 2994.27,347.68 2994.27,341.89 ; 2994.27,341.81 ccw(c3006.26,341.89) 3006.34,329.9 ccw(c3006.26,341) 3017.36,341 3017.36,398.11 ccw(c3000.67,398.11) 3012.47,409.92 ; v1(3000.07,420.6) 3001.79,420.6 3012.43,409.95
LPDDR4_A2_B: U1.1B7 U12.R9 | length 934.9
  Top Layer w4.2: U12.R9@2984.32,254.26 v1(3000.07,267.05)
  Bottom Layer w4.2: v1(2341.09,253.44) 2341.09,267.55 cw(c2350.48,267.55) 2343.19,273.46 2405.5,335.77 cw(c2413.62,327.68) 2420.39,336.93 cw(c2417.93,333.65) 2420.81,336.58 2438.21,319.17 ccw(c2452.54,333.5) 2452.54,313.23 2489.16,313.23 ccw(c2489.16,319.33) 2495.26,319.33 2495.26,336.71 cw(c2501.36,336.71) 2507.46,336.71 2507.46,318.76 ccw(c2513.56,318.76) 2519.66,318.76 2519.66,336.98 cw(c2525.76,336.98) 2531.86,336.98 2531.86,319.33 ccw(c2537.96,319.33) 2537.96,313.23 2635.56,313.23 ccw(c2635.56,320.25) 2642.58,320.25 2642.58,335.9 ; v1(3000.07,267.05) 2986.45,267.05 cw(c2986.45,276.15) 2977.36,276.15 2977.36,333.31 ccw(c2968.14,333.31) 2968.14,342.53 2879.24,342.53 2648.91,342.53 ; 2642.58,335.9 cw(c2650.8,335.93) 2644.3,340.96 cw(c2647.53,338.43) 2647.53,342.53 2648.91,342.53 ; 2642.58,335.9 2642.58,337.72 cw(c2646.68,337.69) 2644.21,340.96 cw(c2648.91,334.69) 2648.91,342.53
LPDDR4_A3_A: U1.1B3 U12.H10 | length 828.6
  Top Layer w4.2: U12.H10@3015.82,433.4 v1(3031.57,446.19)
  Signal L2 w4.7: v1(2413.47,325.83) 2413.47,337.43 cw(c2429.19,337.43) 2418.06,348.53 2442.68,373.15 cw(c2449.01,366.79) 2449.01,375.77 2457.74,375.77 ccw(c2457.74,384.17) 2466.14,384.17 2466.14,404.92 cw(c2474.54,404.92) 2482.94,404.92 2482.94,384.17 ccw(c2491.34,384.17) 2491.34,375.77 2502.67,375.77 cw(c2502.67,360.77) 2513.27,371.38 2524.38,360.27 ccw(c2535.84,371.73) 2535.84,355.53 2585.69,355.53 cw(c2585.69,334.6) 2600.47,349.41 ; 2600.49,349.4 2602.97,346.91 ccw(c2613.57,357.53) 2613.57,342.53 3002.65,342.53 ccw(c3002.65,357.24) 3017.36,357.24 3017.36,425.76 cw(c3032.36,425.76) 3021.75,436.37 v1(3031.57,446.19)
LPDDR4_A3_B: U1.1B6 U12.R10 | length 828.5
  Top Layer w4.2: v1(3000.07,241.46) U12.R10@3015.82,254.26
  Signal L2 w4.7: v1(2359.18,271.54) 2359.15,260.42 ccw(c2375.5,260.42) 2363.73,249.08 2364.62,247.97 ccw(c2384.21,263.85) 2402.04,246.02 2404.46,248.44 cw(c2418.15,234.75) 2418.15,254.11 2479.7,254.11 ccw(c2479.7,262.81) 2488.4,262.77 ; 2488.4,262.81 cw(c2496.65,262.78) 2504.9,262.81 ; 2504.9,262.77 2504.9,262.51 ccw(c2513.3,262.51) 2521.7,262.51 2521.7,262.81 cw(c2530.1,262.81) 2538.5,262.81 2538.5,262.51 ccw(c2546.9,262.51) 2555.3,262.51 2555.3,262.78 ; 2555.3,262.81 cw(c2563.55,262.78) 2571.79,262.8 ccw(c2580.5,262.81) 2580.5,254.11 2667.38,254.11 ccw(c2667.38,283.22) 2687.95,262.62 ; 2687.97,262.64 cw(c2698.57,252.03) 2698.57,267.03 2751.14,267.03 ccw(c2751.14,282.03) 2761.74,271.41 2766.15,275.82 cw(c2776.07,265.89) 2766.32,275.99 cw(c2776.07,265.89) 2776.07,279.93 3011.09,279.93 cw(c3011.09,268.88) 3022.14,268.88 3022.14,249.88 cw(c3013.72,249.88) 3013.72,241.46 v1(3000.07,241.46)
LPDDR4_A4_A: U1.1B1 U12.H11 | length 834.1
  Top Layer w4.2: U12.H11@3047.31,433.4 v1(3063.06,446.19)
  Signal L1 w4.7: v1(2449.66,362.02) 2448.51,360.81 ccw(c2456.74,352.99) 2448.74,344.93 2471.55,322.12 ; 2471.58,322.09 ccw(c2480.88,331.4) 2480.88,318.24 ; 2480.93,318.24 2716.89,318.24 cw(c2716.89,305.07) 2726.17,314.42 ccw(c2736.78,325.04) 2726.23,314.37 ccw(c2736.78,325.04) 2736.78,310.03 2932.94,310.03 cw(c2932.94,303.68) 2939.29,303.68 2939.29,299.94 ccw(c2945.64,299.94) 2951.99,299.94 2951.99,303.98 cw(c2958.34,303.98) 2964.69,303.98 2964.69,299.94 ccw(c2971.04,299.94) 2977.39,299.94 2977.39,303.68 cw(c2983.74,303.68) 2983.74,310.03 3033.98,310.03 ccw(c3033.98,323.31) 3047.26,323.31 3047.26,429.13 ; 3047.26,429.16 cw(c3063.84,429.16) 3059.27,445.1 v1(3063.06,446.19)
LPDDR4_A4_B: U1.1A6 U12.R11 | length 834
  Top Layer w4.2: U12.R11@3047.31,254.26 v1(3063.06,241.46)
  Signal L2 w4.7: v1(2377.28,253.44) 2377.28,265.44 cw(c2391.26,265.44) 2381.36,275.31 2387.98,281.93 cw(c2393.46,276.45) 2393.46,284.2 2400.26,284.2 cw(c2400.26,276.12) 2405.98,281.84 2407.91,279.91 ccw(c2414.99,286.99) 2414.99,276.97 2461.26,276.97 ccw(c2461.26,287.4) 2468.63,280.03 2477.12,288.51 cw(c2487.08,278.56) 2487.08,292.64 2583.81,292.64 2598.86,292.64 cw(c2598.86,286.29) 2605.21,286.29 2605.21,285.93 ccw(c2611.56,285.93) 2617.91,285.93 2617.91,288.26 cw(c2624.26,288.26) 2630.61,288.26 2630.61,285.93 ccw(c2636.96,285.93) 2643.31,285.93 2643.31,286.29 cw(c2649.66,286.29) 2649.66,292.64 2667.37,292.64 2713.5,292.64 ccw(c2713.5,310.18) 2725.89,297.76 cw(c2751.03,272.66) 2734.41,304.06 cw(c2744.03,285.89) 2744.03,306.44 3040.68,306.44 cw(c3040.68,299.18) 3047.95,299.18 3047.95,246.28 ccw(c3052.77,246.28) 3052.77,241.46 v1(3063.06,241.46)
LPDDR4_A5_A: U1.1A1 U12.J11 | length 930.3
  Top Layer w4.2: U12.J11@3047.31,407.81 v1(3063.06,420.6)
  Bottom Layer w4.2: v1(2467.76,343.92) 2467.76,371.41 cw(c2474.89,371.45) 2474.89,378.58 2485.61,378.58 cw(c2485.61,372.08) 2492.11,372.08 2492.11,367.12 ccw(c2498.61,367.12) 2505.11,367.12 2505.11,372.08 cw(c2511.61,372.08) 2518.11,372.08 2518.11,367.12 ccw(c2524.61,367.12) 2531.11,367.12 2531.11,372.08 cw(c2537.61,372.08) 2537.61,378.58 2555.7,378.58 cw(c2555.7,372.08) 2562.2,372.08 2562.2,367.18 ccw(c2568.7,367.18) 2575.2,367.18 2575.2,372.08 cw(c2581.7,372.08) 2588.2,372.08 2588.2,367.18 ccw(c2594.7,367.18) 2601.2,367.18 2601.2,372.08 cw(c2607.7,372.08) 2614.2,372.08 2614.2,367.18 ccw(c2620.7,367.18) 2627.2,367.18 2627.2,372.08 cw(c2633.7,372.08) 2633.7,378.58 2648.94,378.58 cw(c2648.94,372.66) 2654.86,372.66 2654.86,364.93 ccw(c2666.08,364.93) 2666.08,353.71 2890.16,353.71 2892.26,353.71 ccw(c2892.26,359.81) 2898.36,359.81 2898.36,364.63 cw(c2904.46,364.63) 2910.56,364.63 2910.56,358.45 ccw(c2916.66,358.45) 2922.76,358.45 2922.76,364.63 cw(c2928.86,364.63) 2934.96,364.63 2934.96,359.81 ccw(c2941.06,359.81) 2941.06,353.71 2953.43,353.71 3066.08,353.71 3067.49,353.54 ccw(c3068.73,364.06) 3079.33,364.06 3079.33,413.91 ccw(c3072.64,413.91) 3072.64,420.6 v1(3063.06,420.6)
LPDDR4_A5_B: U1.B8 U12.P11 | length 840.9
  Top Layer w4.2: v1(2394.98,307.57) 2403.64,307.57 cw(c2403.64,286.89) 2418.26,301.51 2441.07,278.7 ccw(c2448.27,285.89) 2443.71,276.79 ccw(c2448.27,285.89) U1.B8@2448.27,275.71 ; U12.P11@3047.31,279.85 v1(3063.06,267.05)
  Signal L2 w4.7: v1(2394.98,307.57) 2401.35,301.2 ; 2401.37,301.18 ccw(c2416.72,316.57) 2416.72,294.83 2444.47,294.83 ccw(c2444.47,313.13) 2457.39,300.18 2469.36,312.14 cw(c2483.14,298.36) 2483.14,317.85 3066.29,317.85 cw(c3066.29,304.07) 3080.07,304.07 3080.07,275.74 cw(c3071.38,275.74) 3071.38,267.05 v1(3063.06,267.05)
LPDDR4_CKE0_A: U1.B4 U12.J4 | length 835.9
  Top Layer w4.2: v1@2431.36,343.59 2443.49,343.59 cw(c2443.49,327.25) 2455.04,338.8 2463.19,330.65 ccw(c2488.29,355.74) 2488.29,320.26 U1.B4@2492.81,320.26 ; U12.J4@2826.84,407.81 v1(2842.59,395.01)
  Bottom Layer w4.2: 2415.14,359.95 2422.31,352.78 ccw(c2441.7,368.05) 2424.2,350.64 v1@2432.36,342.49 ; 2415.13,359.95 cw(c2426.24,371.06) 2410.54,371.06 cw(c2426.24,371.06) 2415.13,382.16 2452.32,419.35 cw(c2462.49,409.23) 2462.51,423.58 cw(c2462.49,408.15) 2473.43,419.02 ; 2473.46,418.99 2475.81,416.64 2498.93,393.53 ccw(c2503.99,398.59) 2499.49,393.02 ccw(c2503.99,398.59) 2503.99,391.43 2554.59,391.43 ccw(c2554.59,399.06) 2562.22,399.06 2562.22,440.42 cw(c2568.72,440.42) 2575.22,440.42 2575.22,398.41 ccw(c2581.72,398.41) 2588.22,398.41 2588.22,439.76 cw(c2594.72,439.76) 2601.22,439.76 2601.22,400.48 ccw(c2607.72,400.48) 2607.72,393.98 2662.63,393.98 cw(c2662.63,386.75) 2669.86,386.75 2669.86,373.96 ccw(c2677.61,373.96) 2677.61,366.21 2834.94,366.21 ccw(c2834.94,373.86) 2842.59,373.86 v1(2842.59,395.01)
  other v1: 2431.45,343.69
LPDDR4_CKE0_B: U1.1A3 U12.P4 | length 834.6
  Top Layer w4.2: U12.P4@2826.84,279.85 v1(2842.59,292.64)
  Bottom Layer w4.2: v1(2431.56,307.73) 2452.38,286.92 ccw(c2462.98,297.53) 2462.98,282.53 2473.2,282.53 cw(c2473.2,276.03) 2479.7,276.03 2479.7,270.64 ccw(c2486.2,270.64) 2492.7,270.64 2492.7,292.64 cw(c2499.2,292.64) 2505.7,292.64 2505.7,270.64 ccw(c2512.2,270.64) 2518.7,270.64 2518.7,292.64 cw(c2525.2,292.64) 2531.7,292.64 2531.7,270.64 ccw(c2538.2,270.64) 2544.7,270.64 2544.7,292.64 cw(c2551.2,292.64) 2557.7,292.64 2557.7,270.64 ccw(c2564.2,270.64) 2570.7,270.64 2570.7,292.64 cw(c2577.2,292.64) 2583.7,292.64 2583.7,270.64 ccw(c2590.2,270.64) 2596.7,270.64 2596.7,292.64 cw(c2603.2,292.64) 2609.7,292.64 2609.7,270.64 ccw(c2616.2,270.64) 2622.7,270.64 2622.7,276.03 cw(c2629.2,276.03) 2629.2,282.53 2652.36,282.53 ccw(c2652.36,290.03) 2659.86,290.03 2659.86,322.53 cw(c2667.36,322.53) 2667.36,330.03 2831.47,330.03 cw(c2831.47,318.91) 2842.59,318.91 v1(2842.59,292.64)
LPDDR4_CKE1_A: U1.1C3 U12.J5 | length 834.3
  Top Layer w4.2: U12.J5@2858.34,407.81 v1@2871.9,418.82
  Bottom Layer w4.2: v1(2395.37,343.92) 2395.37,390.96 cw(c2412.61,390.96) 2400.41,403.14 2471.76,474.48 cw(c2485.1,461.19) 2485.1,480.03 2607.08,480.03 cw(c2607.08,473.53) 2613.58,473.53 2613.58,431.91 ccw(c2620.08,431.91) 2626.58,431.91 2626.58,473.53 cw(c2633.08,473.53) 2639.58,473.53 2639.58,431.91 ccw(c2646.08,431.91) 2652.58,431.91 2652.58,473.53 cw(c2659.08,473.53) 2659.08,480.03 2664.86,480.03 cw(c2664.86,472.53) 2672.36,472.53 2672.36,436.24 ccw(c2687.36,436.24) 2676.75,425.63 2677.96,424.42 ccw(c2688.57,435.03) 2688.57,420.03 2746.14,420.03 cw(c2746.14,405.03) 2756.75,415.63 ccw(c2772.74,427.22) 2772.74,407.47 2854.61,407.47 ; 2854.61,407.47 ccw(c2854.61,422.81) 2865.48,411.99 v1(2872.09,418.6)
LPDDR4_CKE1_B: U1.1A2 U12.P5 | length 748.5
  Top Layer w4.2: U12.P5@2858.34,279.85 2858.82,279.85 2871.61,267.05 v1(2872.09,267.05)
  Signal L1 w4.7: v1(2449.66,325.83) 2449.66,287.73 ccw(c2457.33,287.7) 2457.38,280.03 2477.67,280.03 ccw(c2477.67,288.43) 2486.07,288.43 2486.07,292.12 cw(c2494.47,292.12) 2502.87,292.12 2502.87,282.65 ccw(c2511.27,282.65) 2519.67,282.65 2519.67,292.45 cw(c2528.07,292.45) 2536.47,292.45 2536.47,282.1 ccw(c2544.87,282.1) 2553.27,282.1 2553.27,291.79 cw(c2561.67,291.79) 2570.07,291.79 2570.07,282.32 ccw(c2578.47,282.32) 2586.87,282.32 2586.82,284.25 2586.81,284.41 cw(c2594.75,284.7) 2594.75,292.64 2722.51,292.64 cw(c2722.51,285.97) 2729.19,285.97 2729.19,279.85 ccw(c2737,279.85) 2737,272.04 2742.26,272.04 ccw(c2742.78,285.62) 2742.78,272.03 ccw(c2742.78,282.03) 2749.85,274.96 2751.99,277.1 cw(c2758.58,270.51) 2758.58,279.83 2855.73,279.83 ccw(c2855.73,286.25) 2862.15,286.24 2862.15,291.04 cw(c2868.65,291.03) 2868.65,297.53 2909.98,297.53 cw(c2909.98,290.65) 2916.85,290.65 2916.85,274.6 cw(c2909.31,274.6) 2909.31,267.05 v1(2872.09,267.05)
LPDDR4_CLK_A_N: U1.B5 U12.J9 | length 773.5
  Top Layer w3.5: U1.B5@2481.68,309.12 2482.25,309.69 2493.56,309.69 cw(c2493.56,299.96) 2500.43,306.85 2507.26,300.03 2507.26,299.92 2511.29,295.88 ccw(c2521.02,305.62) 2512.37,294.91 ccw(c2521.02,305.62) 2521.02,291.85 2589.18,291.85 ccw(c2589.18,300.03) 2597.36,300.03 2597.36,348.32 cw(c2614.49,348.32) 2614.49,365.46 2620.77,365.46 cw(c2620.77,348.5) 2637.72,348.5 2637.72,313.35 ccw(c2643.72,313.35) 2649.72,313.35 2649.72,342.53 cw(c2673.55,342.53) 2673.55,366.35 2877.42,366.35 ccw(c2877.42,373.83) 2884.9,373.83 2884.9,437.46 cw(c2903.15,437.46) 2903.15,455.71 2909.03,455.71 cw(c2909.03,438.46) 2926.28,438.46 2926.28,427.52 ccw(c2933.47,427.52) 2926.35,426.54 ccw(c2933.47,427.52) 2933.47,420.34 2965.77,420.34 cw(c2965.77,405.34) 2976.37,415.95 ; 2976.38,415.95 U12.J9@2983.82,408.51
LPDDR4_CLK_A_P: U1.A5 U12.J8 | length 772.3
  Top Layer w3.5: U1.A5@2492.81,297.99 2502.38,288.42 2502.49,288.42 2507.19,283.72 ccw(c2515.32,291.85) 2507.22,283.69 ccw(c2515.32,291.85) 2515.27,280.35 ; 2515.32,280.35 2589.86,280.35 ; 2589.86,280.36 ccw(c2589.18,300.03) 2608.86,300.03 2608.86,348.32 cw(c2614.49,348.32) 2614.49,353.96 2620.77,353.96 cw(c2620.77,348.5) 2626.22,348.5 2626.22,313.35 ccw(c2643.72,313.35) 2661.22,313.35 2661.22,342.53 cw(c2673.55,342.53) 2673.55,354.85 2704.96,354.85 2718.21,354.85 cw(c2718.21,351.35) 2721.71,351.35 2721.71,349.03 ccw(c2724.58,349.03) 2724.58,346.16 2730.33,346.16 ccw(c2730.33,349.03) 2733.21,349.03 2733.21,351.98 cw(c2736.08,351.98) 2736.08,354.85 2741.83,354.85 cw(c2741.83,351.98) 2744.71,351.98 2744.71,349.03 ccw(c2747.58,349.03) 2747.58,346.16 2753.33,346.16 ccw(c2753.33,349.03) 2756.21,349.03 2756.21,351.98 cw(c2759.08,351.98) 2759.08,354.85 2764.83,354.85 cw(c2764.83,351.98) 2767.71,351.98 2767.71,349.03 ccw(c2770.58,349.03) 2770.58,346.16 2776.33,346.16 ccw(c2776.33,349.03) 2779.21,349.03 2779.21,351.98 cw(c2782.08,351.98) 2782.08,354.85 2787.83,354.85 cw(c2787.83,351.98) 2790.71,351.98 2790.71,350.39 ccw(c2793.58,350.39) 2793.58,347.51 2799.33,347.51 ccw(c2799.33,350.39) 2802.21,350.39 2802.21,351.35 cw(c2805.71,351.35) 2805.71,354.85 2820.89,354.85 2877.42,354.85 ccw(c2877.42,373.83) 2896.4,373.83 2896.4,437.46 cw(c2903.15,437.46) 2903.15,444.21 2909.03,444.21 cw(c2909.03,438.46) 2914.78,438.46 2914.78,427.58 ccw(c2934.09,427.58) 2914.96,424.96 ccw(c2934.09,427.58) 2934.09,408.27 U12.J8@2950.99,408.27
LPDDR4_CLK_B_N: U1.B7 U12.P9 | length 741.2
  Top Layer w3.5: U1.B7@2459.41,286.85 2459.98,287.42 2473.62,287.42 cw(c2473.62,277.19) 2480.85,284.43 2499.19,266.08 ccw(c2509.8,276.69) 2509.8,261.69 2559.74,261.69 cw(c2559.74,244.94) 2576.49,244.94 2576.49,240.02 ccw(c2581.74,240.02) 2586.99,240.02 2586.99,244.94 cw(c2603.74,244.94) 2620.49,244.94 2620.49,240.02 ccw(c2625.74,240.02) 2630.99,240.02 2630.99,256.71 cw(c2652.99,256.71) 2652.99,278.71 2662.85,278.71 ccw(c2662.82,289.58) 2673.69,289.58 2673.69,314.21 cw(c2677.19,314.21) 2673.69,314.36 2673.73,315.41 cw(c2695.52,313.61) 2693.67,335.39 ; 2693.67,335.44 2865,335.44 cw(c2865,303.43) 2897,303.43 2897,269.03 ccw(c2901.42,269.03) 2901.42,264.62 2909.59,264.62 ccw(c2909.59,269.18) 2914.16,269.18 2914.16,279.88 cw(c2925.62,279.88) 2917.34,287.82 cw(c2928.99,276.17) 2918.53,288.89 cw(c2928.99,276.17) 2926.76,292.49 cw(c2928.99,276.17) 2928.99,292.64 2964.71,292.64 cw(c2964.71,276.16) 2976.34,287.85 U12.P9@2983.71,280.47
LPDDR4_CLK_B_P: U1.A7 U12.P8 | length 743.9
  Top Layer w3.5: U1.A7@2470.54,275.71 2473.3,275.71 2480.46,268.55 cw(c2477.63,265.72) 2480.46,262.9 ccw(c2483.29,260.07) 2480.46,257.24 2482.23,255.47 ccw(c2485.05,258.3) 2487.88,255.47 cw(c2490.71,252.64) 2493.54,255.47 2496.18,252.83 ccw(c2502.56,259.21) 2502.56,250.19 2503.24,250.19 2514.49,250.19 cw(c2514.49,245.44) 2519.24,245.44 2519.24,244.64 ccw(c2523.99,244.64) 2528.74,244.64 2528.74,245.44 cw(c2533.49,245.44) 2538.24,245.44 ccw(c2542.99,245.44) 2547.74,245.44 cw(c2552.49,245.44) 2552.49,250.19 2559.52,250.19 2559.74,250.19 cw(c2559.74,244.94) 2564.99,244.94 2564.99,240.02 ccw(c2581.74,240.02) 2598.49,240.02 2598.49,244.94 cw(c2603.74,244.94) 2608.99,244.94 2608.99,240.02 ccw(c2625.74,240.02) 2642.49,240.02 2642.49,256.71 cw(c2652.99,256.71) 2652.99,267.21 2659.27,267.21 2662.86,267.21 ccw(c2662.82,289.58) 2685.19,289.58 2685.19,296.13 2685.19,309.45 2685.19,314.21 cw(c2688.69,314.22) 2685.2,314.5 cw(c2695.52,313.61) 2694.63,323.93 2769.62,323.94 cw(c2769.62,320.44) 2773.12,320.44 2773.12,319.1 ccw(c2775.42,319.1) 2775.42,316.8 2782.32,316.8 ccw(c2782.32,319.1) 2784.62,319.1 2784.62,320.44 cw(c2788.12,320.44) 2788.12,323.94 2833.56,323.94 cw(c2833.56,320.44) 2837.06,320.44 2837.06,319.1 ccw(c2839.36,319.1) 2839.36,316.8 2846.26,316.8 ccw(c2846.26,319.1) 2848.56,319.1 2848.56,320.44 cw(c2852.06,320.44) 2852.06,323.94 2865,323.94 cw(c2865,303.43) 2885.5,303.43 2885.5,269.03 ccw(c2901.42,269.03) 2901.42,253.12 2909.59,253.12 ccw(c2909.59,269.18) 2925.66,269.18 2925.66,275.12 cw(c2930.12,275.12) 2930.12,279.59 2952.57,279.59 U12.P8@2952.82,279.85
LPDDR4_CS0n_A: U1.B3 U12.H4 | length 781.8
  Top Layer w4.2: U1.B3@2503.95,331.39 2503.95,318.69 ccw(c2511.95,318.66) 2506.27,313.03 2509.35,309.95 ccw(c2515.32,315.96) 2515.32,307.49 2517.65,307.49 2565.19,307.49 ccw(c2565.19,324.7) 2577.36,312.53 ccw(c2565.28,324.6) 2582.36,324.6 2582.36,363.49 cw(c2606.4,363.49) 2606.4,387.53 2627.43,387.53 ccw(c2627.43,393.68) 2633.58,393.68 2633.58,394.44 cw(c2639.73,394.44) 2645.88,394.44 2645.88,393.68 ccw(c2652.03,393.68) 2652.03,387.53 2676.41,387.53 ; v1(2657.36,407.49) 2676.97,407.49 cw(c2676.97,402.41) 2682.04,402.41 2682.04,393.14 cw(c2676.43,393.14) 2676.43,387.53 ; U12.H4@2826.84,433.4 v1(2842.59,420.6)
  Signal L2 w4.7: v1(2657.36,407.49) ccw(c2642.17,422.67) 2663.64,422.67 2663.64,450.53 cw(c2669.29,450.53) 2666.73,455.57 cw(c2669.29,450.53) 2669.29,456.18 2678.44,456.18 cw(c2678.44,451.05) 2682.78,453.79 cw(c2678.83,451.3) 2683.5,451.3 2683.5,402.73 ccw(c2691.22,402.73) 2691.22,395.01 2712.89,395.01 ccw(c2712.89,399.76) 2717.63,399.76 2717.63,407.85 cw(c2722.98,407.85) 2722.98,413.2 2753.69,413.2 ccw(c2753.69,421.6) 2753.69,430 2723.97,430 cw(c2723.97,437.34) 2716.63,437.34 cw(c2724.26,437.34) 2724.26,444.97 2785.7,444.97 2785.9,444.98 cw(c2786.05,436.02) 2795.01,436.02 2795.01,414.65 ccw(c2802.09,414.65) 2802.09,407.57 2837.39,407.57 ccw(c2837.39,412.78) 2842.59,412.78 v1(2842.59,420.6)
LPDDR4_CS0n_B: U1.1B5 U12.R4 | length 834.6
  Top Layer w4.2: U12.R4@2826.84,254.26 v1(2842.59,267.05)
  Bottom Layer w4.2: v1(2377.28,289.64) 2401.77,289.64 2401.83,289.64 cw(c2401.82,270.68) 2415.22,284.08 2445.27,254.03 2445.31,254 ccw(c2454.83,263.53) 2454.83,250.05 ; 2454.86,250.05 2474.44,250.05 cw(c2474.44,244.82) 2479.68,244.82 2479.68,234.34 ccw(c2484.92,234.34) 2484.92,229.1 2487.44,229.1 ccw(c2487.44,234.34) 2492.68,234.34 2492.68,244.82 cw(c2497.92,244.82) 2497.92,250.05 2500.44,250.05 cw(c2500.44,244.82) 2505.68,244.82 2505.68,234.34 ccw(c2510.92,234.34) 2510.92,229.1 2513.44,229.1 ccw(c2513.44,234.34) 2518.68,234.34 2518.68,244.82 cw(c2523.92,244.82) 2523.92,250.05 2526.44,250.05 cw(c2526.44,244.82) 2531.68,244.82 2531.68,234.34 ccw(c2536.92,234.34) 2536.92,229.1 2539.44,229.1 ccw(c2539.44,234.34) 2544.68,234.34 2544.68,244.82 cw(c2549.92,244.82) 2549.92,250.05 2552.44,250.05 cw(c2552.44,244.82) 2557.68,244.82 2557.68,234.34 ccw(c2562.92,234.34) 2562.92,229.1 2565.44,229.1 ccw(c2565.44,234.34) 2570.68,234.34 2570.68,244.82 cw(c2575.92,244.82) 2575.92,250.05 2578.44,250.05 cw(c2578.44,244.82) 2583.68,244.82 2583.68,234.34 ccw(c2588.92,234.34) 2588.92,229.1 2591.44,229.1 ccw(c2591.44,234.34) 2596.68,234.34 2596.68,244.82 cw(c2601.92,244.82) 2601.92,250.05 2604.44,250.05 cw(c2604.44,244.82) 2609.68,244.82 2609.68,234.34 ccw(c2614.92,234.34) 2614.92,229.1 2617.44,229.1 ccw(c2617.44,234.34) 2622.68,234.34 2622.68,244.41 cw(c2628.45,244.41) 2628.45,250.18 2630.97,250.18 cw(c2630.97,245.47) 2635.68,245.47 2635.68,234.34 ccw(c2640.92,234.34) 2640.92,229.1 2667.95,229.1 ccw(c2667.95,236.01) 2674.86,236.01 2674.86,307.18 cw(c2685.21,307.18) 2685.21,317.53 2821.65,317.53 cw(c2821.65,309.32) 2829.86,309.32 2829.86,286 ccw(c2844.86,286) 2834.25,275.4 v1(2842.59,267.05)
LPDDR4_CS1n_A: U1.A3 U12.H3 | length 771.8
  Top Layer w4.2: U1.A3@2515.08,320.26 2560.12,320.26 ccw(c2560.12,331.93) 2571.8,331.93 2571.8,371.7 cw(c2594.03,371.7) 2578.29,387.4 2588.93,398.04 ccw(c2570.25,416.71) 2596.66,416.71 ; 2596.66,416.75 2596.66,431.55 cw(c2602.81,431.55) 2608.96,431.55 2608.96,414.06 2608.96,413.13 ccw(c2614.57,413.13) 2614.47,407.52 ccw(c2614.52,411.72) 2614.53,407.52 2614.6,407.52 2614.67,407.52 v1(2622.36,407.8) ; U12.H3@2795.34,433.4 v1(2811.1,420.6)
  Signal L2 w4.7: v1(2622.36,407.8) 2584.13,407.8 cw(c2584.13,414.58) 2577.36,414.58 2577.36,464.85 cw(c2585.03,464.85) 2585.03,472.53 2587.66,472.53 cw(c2587.66,464.13) 2596.06,464.13 2596.06,435.85 ccw(c2604.46,435.85) 2612.86,435.85 2612.86,464.13 cw(c2621.26,464.13) 2629.66,464.13 2629.66,435.85 ccw(c2638.06,435.85) 2646.46,435.85 2646.46,461.1 cw(c2657.89,461.1) 2657.89,472.52 2701.65,472.52 cw(c2701.65,460.75) 2709.97,469.07 2710.52,468.52 ccw(c2717.51,475.52) 2717.51,465.63 2754.71,465.63 cw(c2754.76,455.9) 2754.81,465.63 cw(c2754.76,455.9) 2761.63,462.78 2762.73,461.69 ccw(c2769.99,468.95) 2769.99,458.68 ; 2770.02,458.68 2803.61,458.68 cw(c2803.61,450.88) 2811.41,450.88 v1@2811.41,420.91
LPDDR4_CS1n_B: U1.1A5 U12.R3 | length 834.6
  Top Layer w4.2: U12.R3@2795.34,254.26 v1(2811.1,267.05)
  Bottom Layer w4.2: v1(2395.37,271.54) 2446.47,220.44 ccw(c2458.31,232.28) 2458.34,215.54 2475.91,215.54 cw(c2475.91,211.04) 2480.41,211.04 2480.41,204.03 ccw(c2486.91,204.03) 2493.41,204.03 2493.41,210.16 cw(c2499.91,210.16) 2506.41,210.16 2506.41,204.03 ccw(c2512.91,204.03) 2519.41,204.03 2519.41,210.16 cw(c2525.91,210.16) 2532.41,210.16 2532.41,204.03 ccw(c2538.91,204.03) 2545.41,204.03 2545.41,210.16 cw(c2551.91,210.16) 2558.41,210.16 2558.41,204.03 ccw(c2564.91,204.03) 2571.41,204.03 2571.41,210.16 cw(c2577.91,210.16) 2584.41,210.16 2584.41,204.03 ccw(c2590.91,204.03) 2597.41,204.03 2597.41,210.16 cw(c2603.91,210.16) 2610.41,210.16 2610.41,204.03 ccw(c2616.91,204.03) 2623.41,204.03 2623.41,210.16 cw(c2629.91,210.16) 2636.41,210.16 2636.41,204.03 ccw(c2642.91,204.03) 2649.41,204.03 2649.41,210.16 cw(c2655.91,210.16) 2662.41,210.16 2662.41,204.03 ccw(c2668.91,204.03) 2675.41,204.03 2675.41,210.16 cw(c2681.91,210.16) 2688.41,210.16 2688.41,204.03 ccw(c2694.91,204.03) 2701.41,204.03 2701.41,210.16 cw(c2707.91,210.16) 2714.41,210.16 2714.41,204.03 ccw(c2720.91,204.03) 2720.91,197.53 2756.11,197.53 ccw(c2756.14,205.29) 2761.63,199.8 ccw(c2753.84,207.59) 2764.86,207.59 2764.86,215.81 2764.86,217.91 ccw(c2758.76,217.91) 2758.76,224.01 2737.12,224.01 cw(c2737.12,230.11) 2737.12,236.21 2758.76,236.21 ccw(c2758.76,242.31) 2764.86,242.31 2764.86,258.23 2764.86,258.3 cw(c2773.3,258.32) 2772.45,266.73 cw(c2772.83,262.54) 2772.83,266.74 2810.78,266.74 v1(2811.1,267.05)